# Altium PCB electrode.PcbDoc
Units mil, origin at the board's own origin, x right, y up, seen from the top; angles counter-clockwise.
Board outline 1400 x 890 mil, 2 copper layers (Top Layer, Bottom Layer), stack 61.2 mil thick; 2 components, 4 nets, 11 pads, 0 vias.
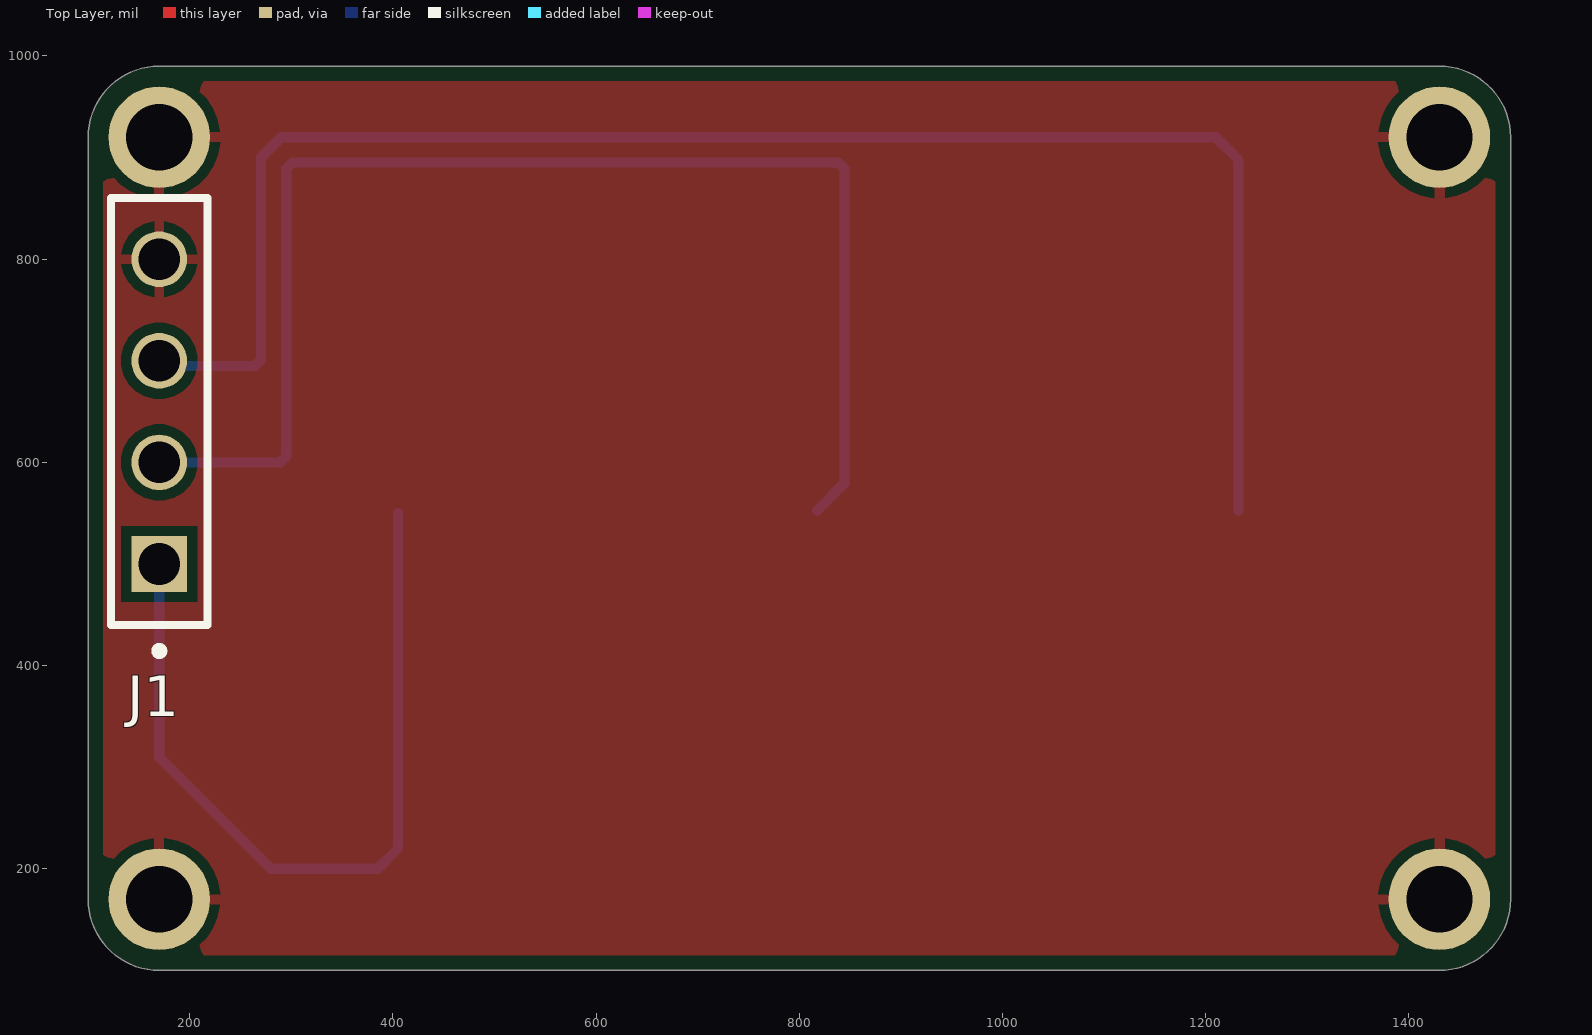
[diagram p0: Top Layer view]
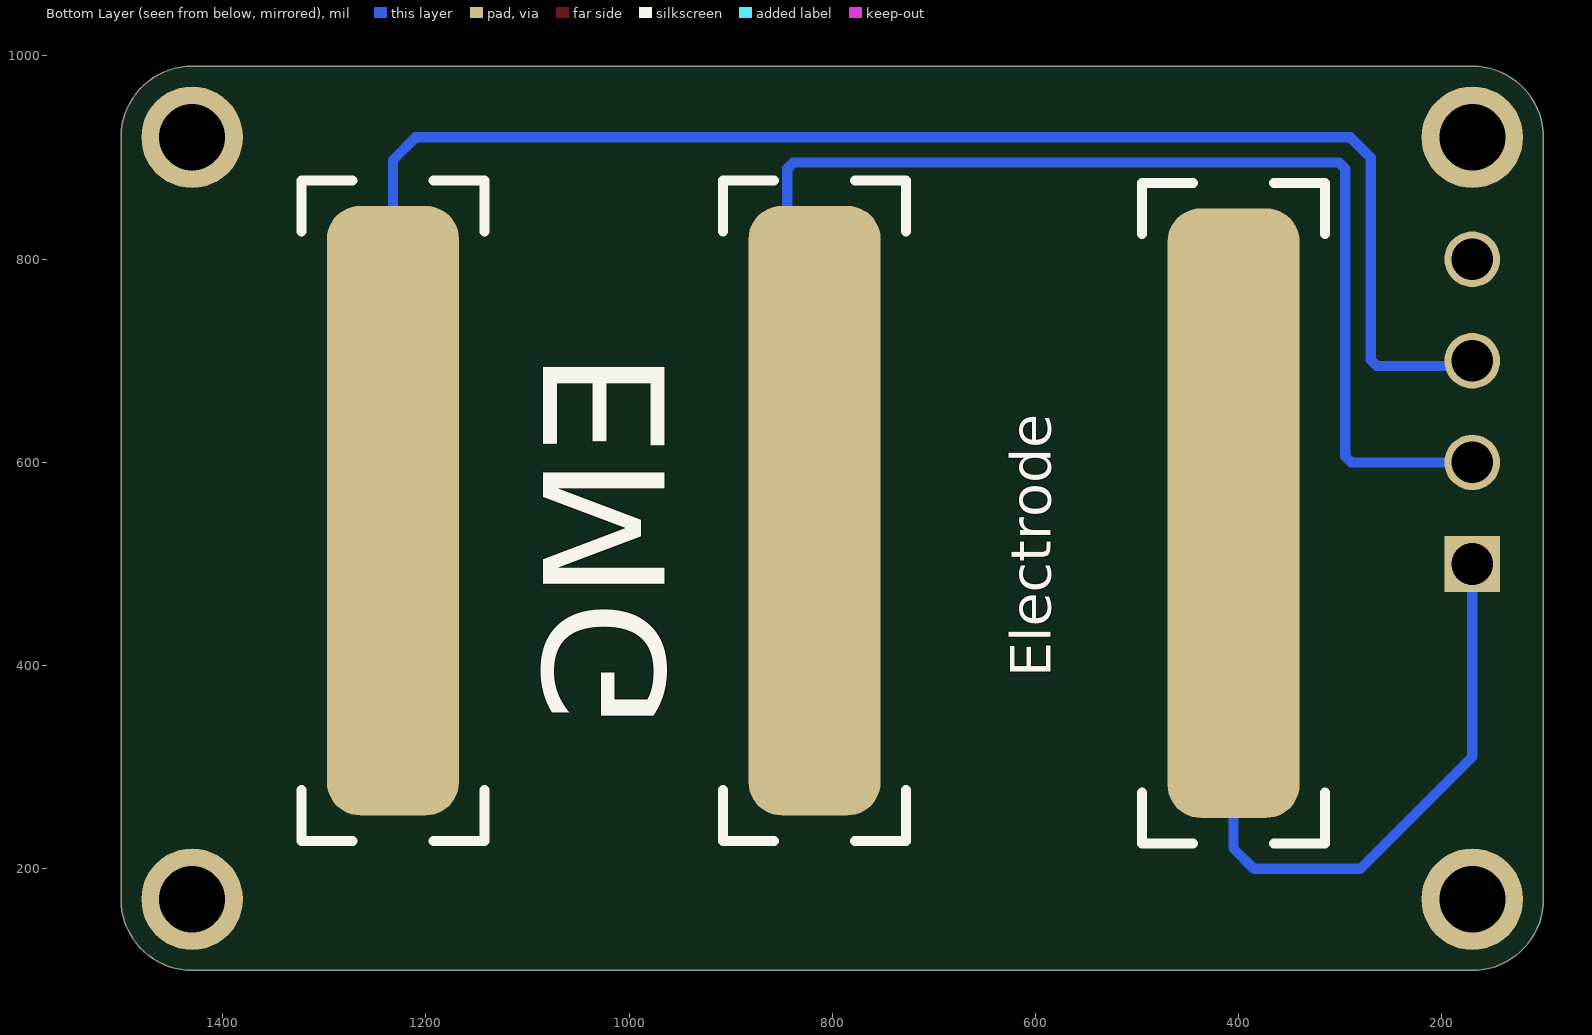
[diagram p1: Bottom Layer view, seen from below]

## Layer stack, top to bottom
Top Solder: solder mask 0.4, Solder Resist, Dk 3.5
Top Layer: signal copper 1.4
Dielectric 1: dielectric 58.4, FR-4, Dk 4.8
Bottom Layer: signal copper 1.4
Bottom Solder: solder mask 0.4, Solder Resist, Dk 3.5

## Board outline
170,100 cw(c170,170) 100,170 100,920 cw(c170,920) 170,990 1430,990 cw(c1430,920) 1500,920 1500,170 cw(c1430,170) 1430,100

## Design rules (kind name [scope] priority, off if disabled: settings)
Clearance [All] p1: gap=10 ignorepadtopadclearanceinfootprint=FALSE
PolygonConnect [All] p1: connectstyle=Relief reliefconductorwidth=10 reliefentries=4 polygonreliefangle="90 Angle" airgapwidth=10
RoutingVias [All] p1: holewidth=28 width=50 viastyle="Through Hole" minholewidth=28 minwidth=50 maxholewidth=28 maxwidth=50
SolderMaskExpansion [All] p1: expansion=4 istentingtop=FALSE
SupplyNets "Schematic Supply Nets" [InNet('GND')] p1: voltage=0.000
Width [All] p1: maxlimit=10 minlimit=10 preferedwidth=10
30 further rules are at their usual default settings.

## Components (designator, comment, footprint, x,y, rotation, side; value= is the part's Value field where it differs from the comment)
Electrode "Electrode" ELECTRODE 820,550 r0 bottom
J1 "SSW-104-01-G-S" SAMTEC_SSW-104-01-G-S 170,500 r90 top

## Footprints (in the part's own frame and the unit in brackets; to place one, negate y for a bottom-side part, rotate by r counter-clockwise, add the part's x,y. Pads: shape width x height; smd on the part's side, far side on the other; paste and mask are expansions set on the pad)
ELECTRODE [mil]
  rrect50% 130x600 smd paste-99999 mask+0: 6(-415,0) 7(-2.66,-2.5) 8(412.34,-2.5)
  silkscreen extent -505,-328 502,325, body extent -490,-313 487,310, height 30
SAMTEC_SSW-104-01-G-S [mm]
  rect 1.39x1.39 hole 1.04: 01(0,0)
  round 1.39 hole 1.04: 02(2.54,0) 03(5.08,0) 04(7.62,0)
  silkscreen extent -2.27,-1.21 9.15,1.21, body extent -1.52,-1.21 9.14,1.21, height 8.51

## Part data
J1: library part SSM-104-L-SV, Package=None, Availability=Unavailable, MF=Samtec, MP=SSM-104-L-SV, Price=None

## Free pads (board coordinates)
  round 100 hole 65: 10(170,170) 10(170,920) 10(1430,170) 10(1430,920)

## Nets (pads, with @x,y where several pads share a name; then routed paths per layer and width w, separated by ;. In a path a pad name is that pad's centre, name@x,y a point inside that pad or via, vN(x,y) a via of type N, cw(c..) or ccw(c..) an arc to the next point about the centre after c; other vN are vias at no path point)
GND: J1.04 pad.10
NetElectrode_6: Electrode.6 J1.01 | length 808.8
  Bottom Layer w10: J1.01 170,310 280,200 385,200 405,220 Electrode.6
NetElectrode_7: Electrode.7 J1.02 | length 1312.7
  Bottom Layer w10: J1.02 289.14,600 295,605.86 295,889.14 300.86,895 838.44,895 844.3,889.14 844.3,579.47 Electrode.7
NetElectrode_8: Electrode.8 J1.03 | length 1628.7
  Bottom Layer w10: J1.03 175,695 264.14,695 270,700.86 270,900 290,920 1210,920 1232.34,897.66 Electrode.8

## Polygon pours and split planes (outlines as drawn)
GND on Top Layer "GND_L01_P000" (solid, pour order 0): 1485,975 1485,115 115,115 115,970 115,975

## Silkscreen, mask and mechanical layers (free items; w line width, h text height)
Bottom Overlay:
  text "EMG" at 965,710 h120 r270
Board Shape:
  the board outline again, w10